# Altium PCB TYH-PD67W 2C1A 主板.pcbdoc (part 2 of 2)
Units mm, origin at the board's own origin, x right, y up, seen from the top; angles counter-clockwise.
Board outline 94.32 x 66.89 mm, 5 copper layers (Top Layer, Signal Layer 3, Signal Layer 1, Signal Layer 2, Bottom Layer), stack 0.941 mm thick; 52 components, 153 nets, 152 pads, 297 vias.
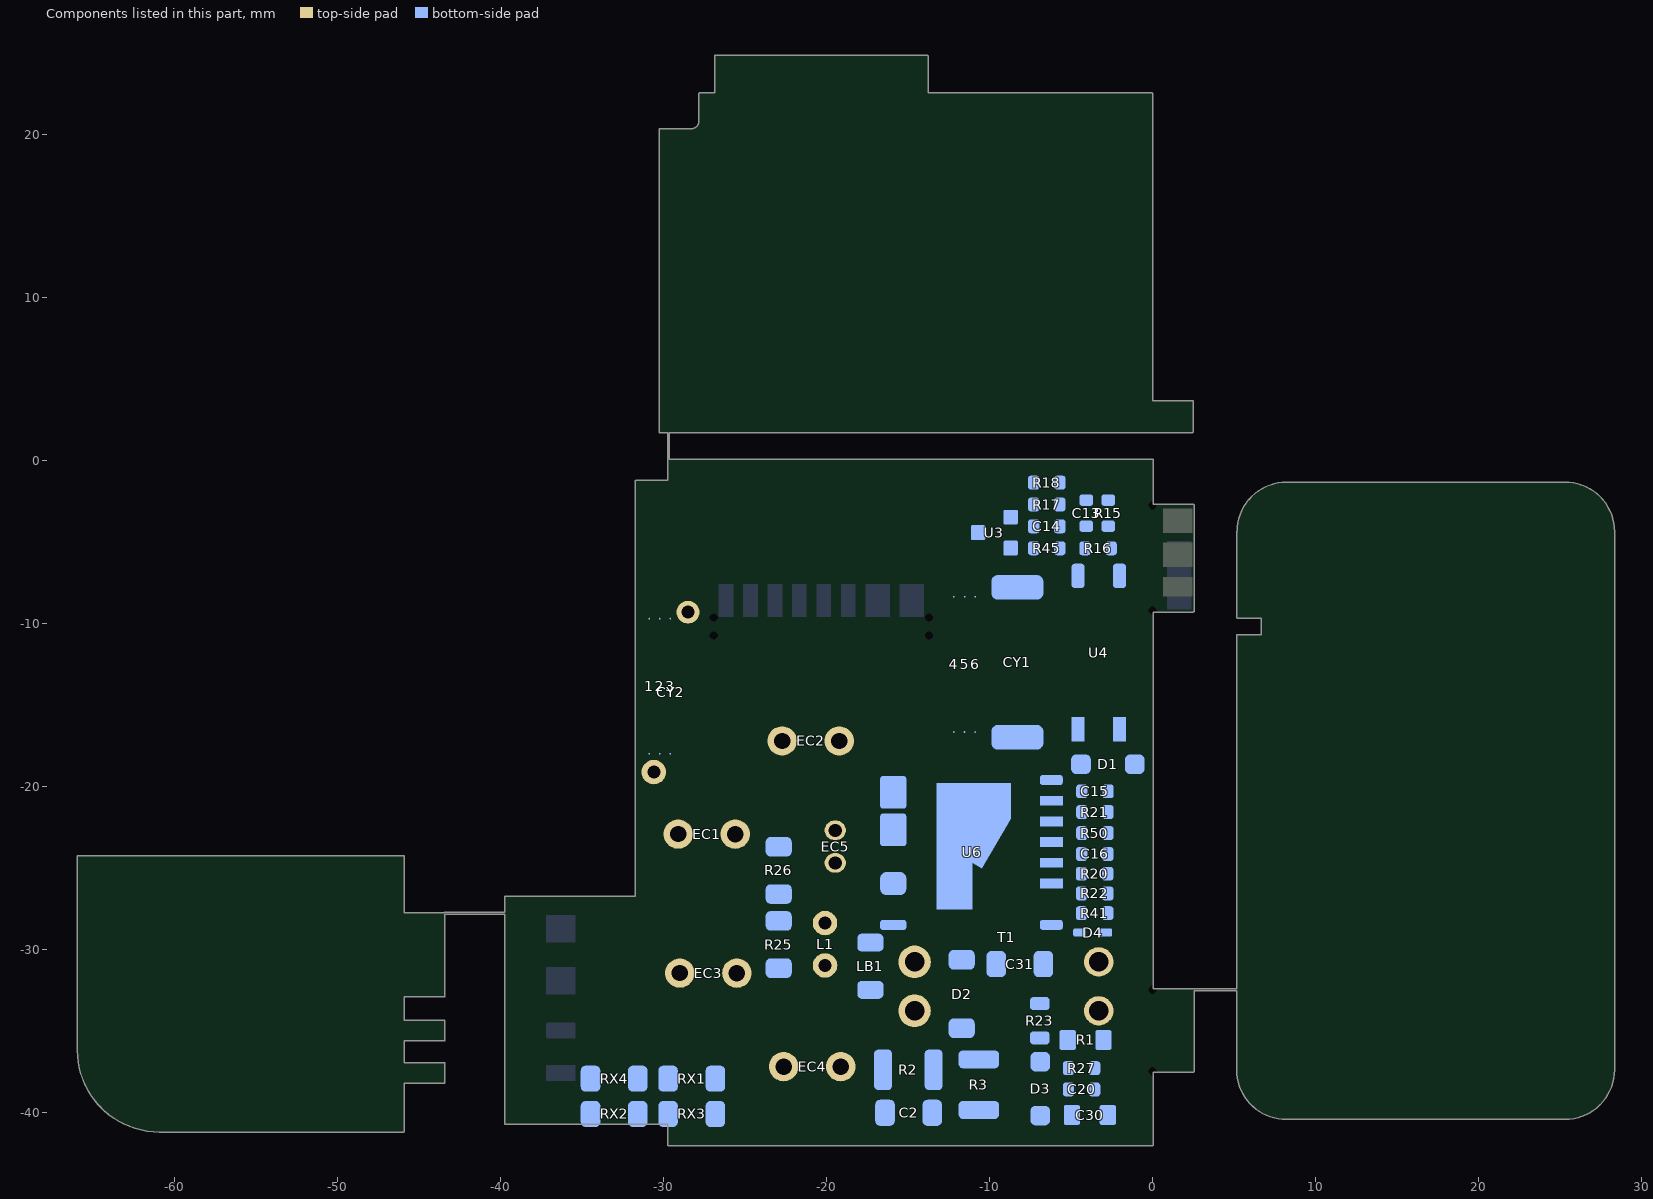
[diagram p4: the components of this part, seen from the top]

## Silkscreen, mask and mechanical layers (free items; w line width, h text height)
Top Overlay:
  circle w0.05: c-3.303,-27.787 r2
  lines w0.05: -38.25,-41.5 -38.25,-26.8 ; -37.25,-41.5 -37.25,-26.8 ; -37.25,-39.04 -29.75,-39.04 -29.75,-34.64 -37.25,-34.64 ; -37.25,-34.397 -37.25,-24.397 -31.85,-24.397 -31.85,-34.397 -37.25,-34.397
  lines w0.1: -31.7,-10.714 0,-10.714 ; -31.7,-9.714 0,-9.714 ; -29.709,-41.459 0.001,-41.459 ; -29.7,-0.55 0,-0.55 ; -27.175,-9.714 -27.175,0.336 ; -21.452,-9.714 -21.452,0.336 ; -16.876,-9.714 -16.876,0.336 ; -13.666,-9.714 -13.666,0.336 ; -8.876,-9.706 -8.876,0.344 ; -5.666,-9.706 -5.666,0.344 ; 0.05,-40.406 1.05,-40.406 1.05,-1.387 0.05,-1.387 0.05,-40.406
Bottom Solder:
  region: -18.056,-23.697 -15.131,-23.697 -15.002,-23.569 -15.002,-18.857 -15.325,-18.534 -17.635,-18.534 -18.044,-18.943 -19.37,-18.943 -19.891,-19.465 -19.891,-21.118 -19.519,-21.491 -18.774,-21.491 -18.253,-22.012 -18.253,-23.5
  region: -13.503,-27.722 -13.503,-19.684 -8.571,-19.684 -8.571,-21.994 -10.439,-25.22 -10.439,-27.722
  lines w1: -34.018,-28.59 -32.764,-28.59 ; -31.192,-28.441 -30.172,-27.421 ; -29.585,-26.155 -29.585,-24.984 ; -28.467,-21.222 -28.467,-21.024 -27.109,-19.666 ; -27.833,-29.533 -26.384,-28.084 ; -26.041,-26.569 -26.041,-24.985 ; -25.751,-18.506 -24.79,-17.545 ; -21.373,-33.069 -20.494,-33.947 ; -19.599,-35.019 -17.087,-35.019 ; -15.658,-34.843 -14.603,-33.787

## Text inside footprints (layer, text, board x,y; h text height)
D2: Bottom Overlay "+" at -11.352,-31.67 h1 r90
EC1: Top Overlay "+" at -29.859,-20.616 h1 r90
EC2: Top Overlay "-" at -19.484,-19.064 h1 r90; Top Overlay "+" at -23.2,-15.527 h1 r90
EC3: Top Overlay "+" at -24.75,-33.803 h1 r270
EC4: Top Overlay "+" at -18.376,-39.542 h1 r270